# Altium PCB 2026.11.05.HMS.PD.CNHH.V5.1.PcbDoc (part 4 of 4)
Units mm, origin at the board's own origin, x right, y up, seen from the top; angles counter-clockwise.
Board outline 110 x 110 mm, 2 copper layers (Top Layer, Bottom Layer); 170 components, 117 nets, 610 pads, 1348 vias.
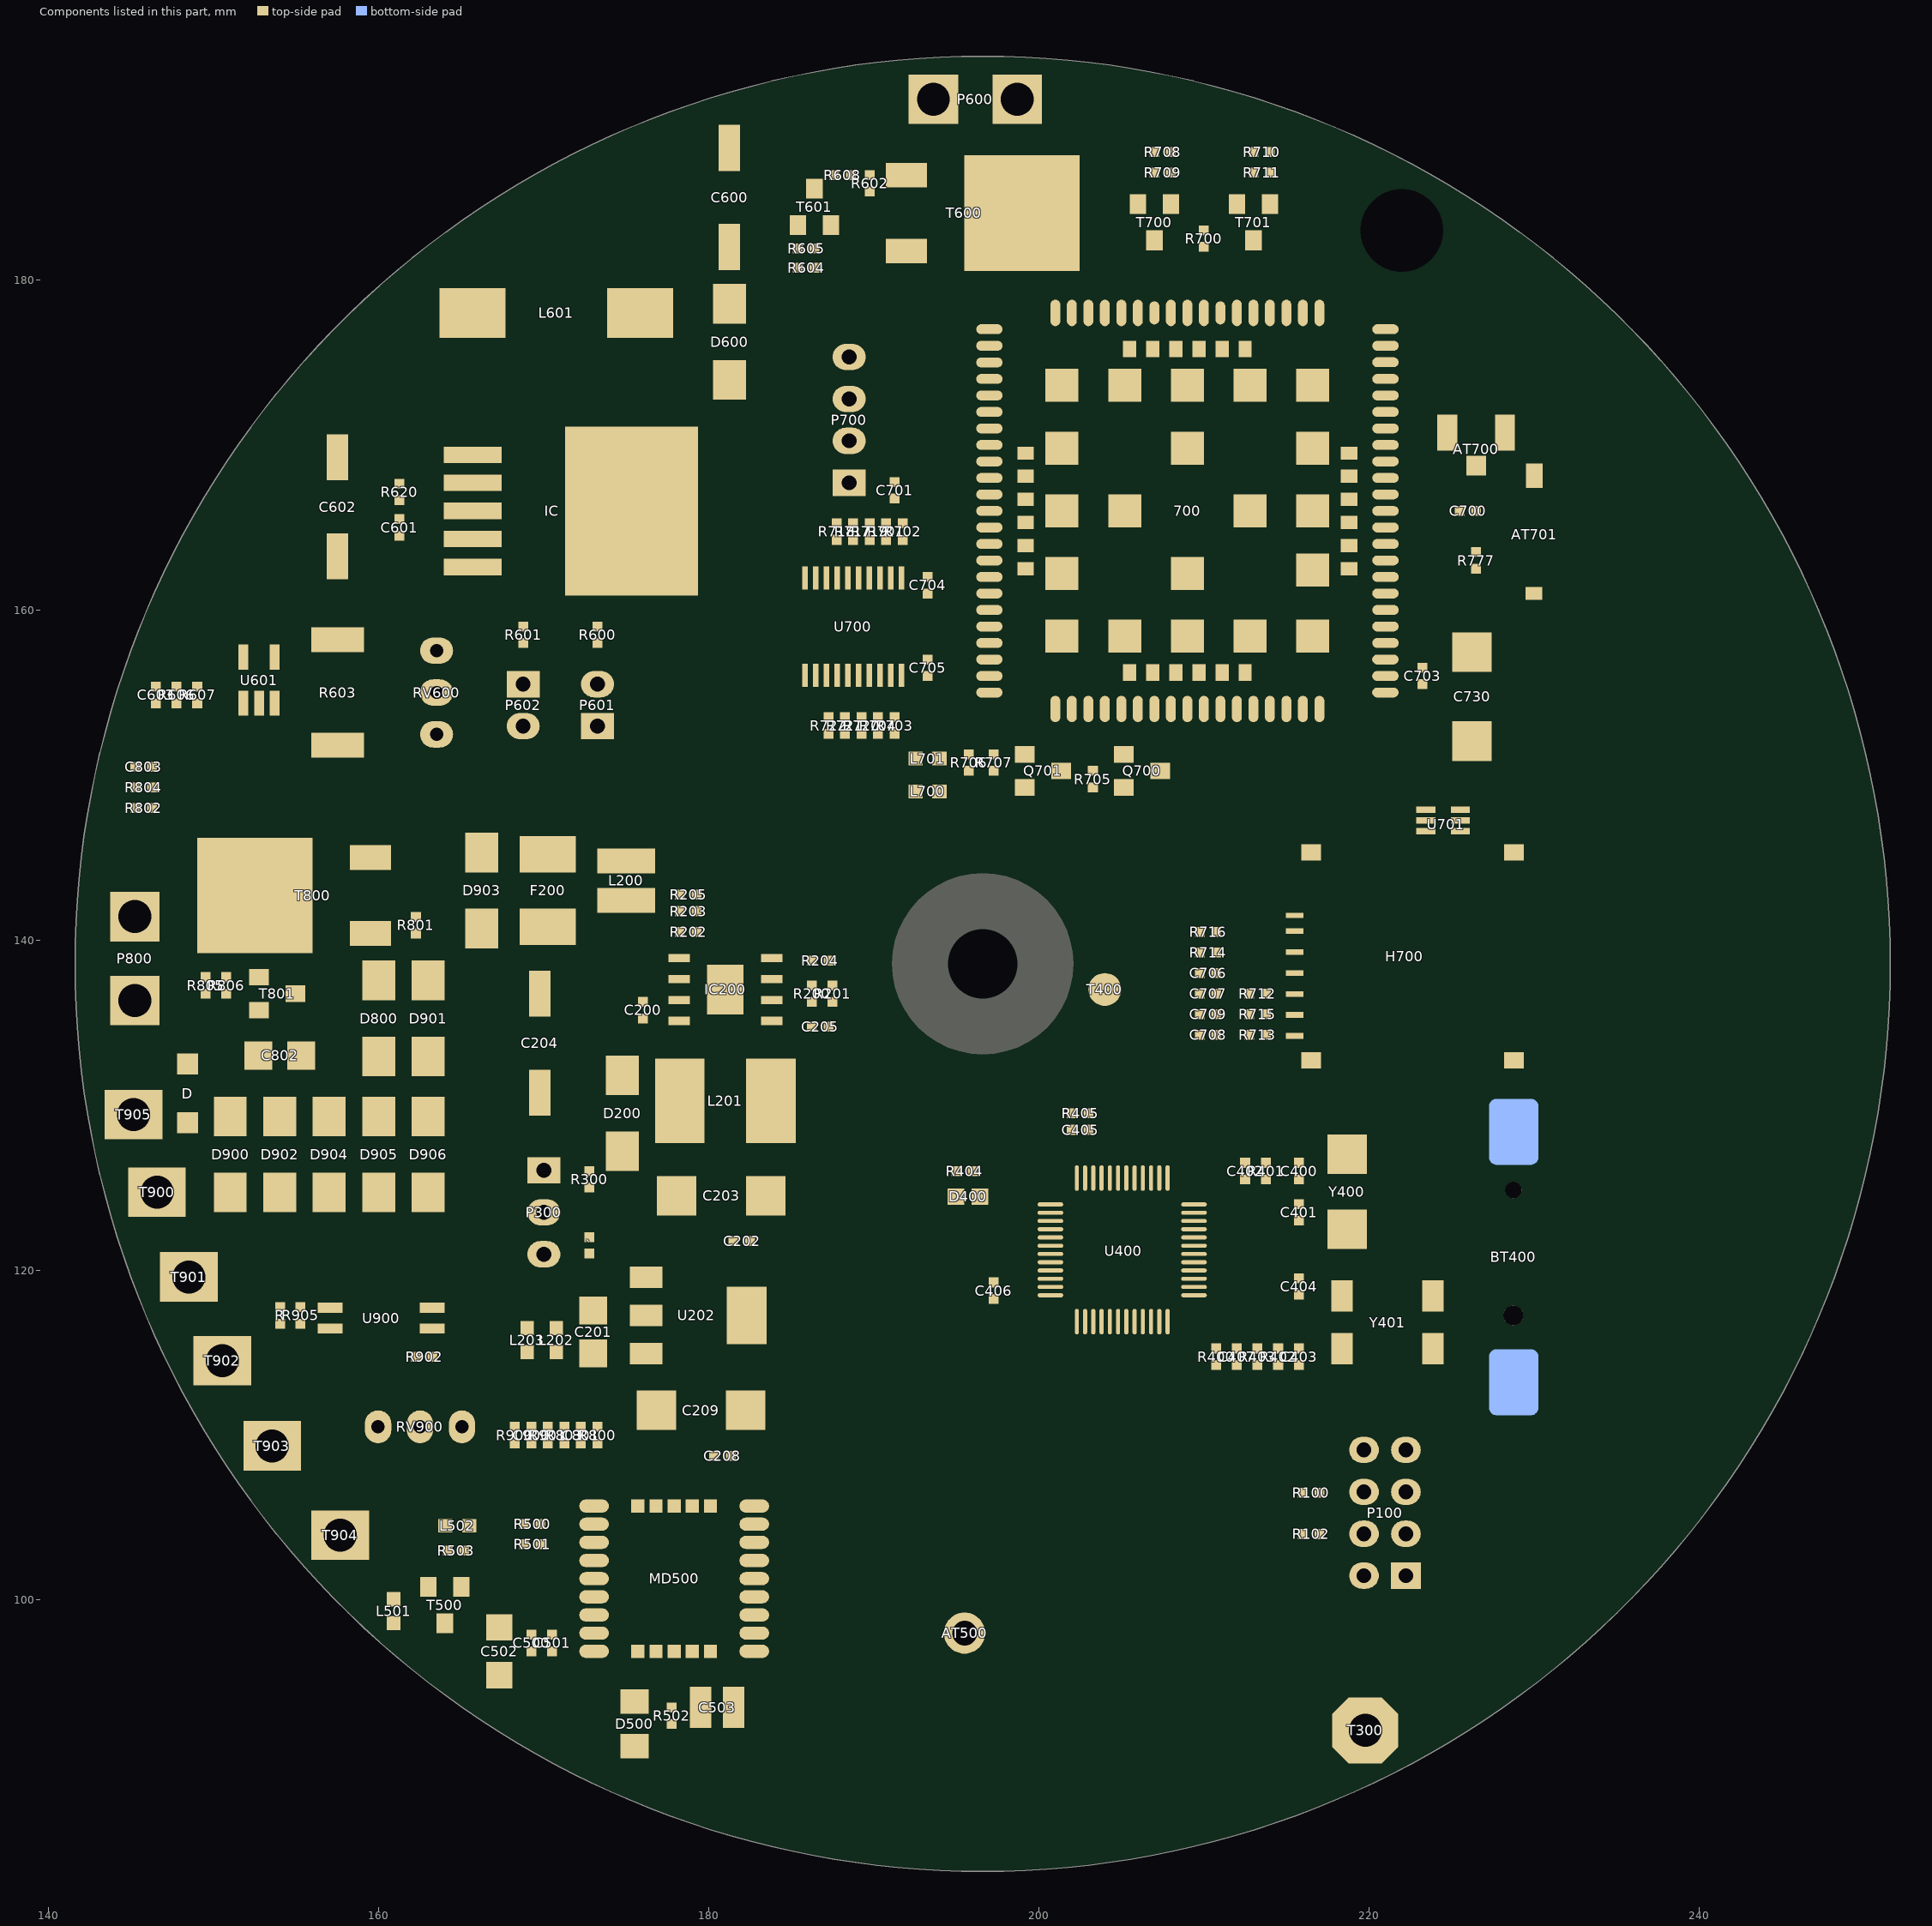
[diagram p3: the components of this part, seen from the top]

## Other copper
Top Layer:
  pour cut-out: 227.211,160.372 cw(c227.054,161.469) 225.946,161.469 225.946,161.672
  pour cut-out: 147.4,128.414 147.4,132.464 149.55,132.464 149.55,128.436
  region net GPS_PWR: 163.4,99.6 163.5,99.7 163.5,102.3 163.8,102.6 164.4,102.6 164.5,102.7 164.5,105 164.4,105.1 162.3,105.1 161.9,104.7 161.9,101.2 161.6,100.9 160.4,100.9 160.2,100.7 160.2,99.8 160.4,99.6
  region net V_SOLAR: 164,128 164.25,128.25 164.25,134 164,134.25 154.75,134.25 154.375,133.875 154.375,131.375 153.75,130.75 150,130.75 149.75,130.5 149.75,128.25 150,128
  region net V_BAT: 144,146.25 143.5,145.75 143.5,139.5 144,139 156,139 156.25,139.25 156.25,146 156,146.25
  region net V_SYSTEM: 172,139.25 166,139.25 164.25,137.5 164.25,136.5 164,136.25 162,136.25 161.75,136.5 161.75,138.75 162,139 163.25,140.25 163.25,141.25 164,142 172,142 172.25,141.75 172.25,139.5
  region net V_BAT: 167.5,148 167,148.5 149.5,148.5 147,146 148.5,144.5 155.5,144.5 157.25,146.25 163.75,146.25 164,146 164,144.25 164.25,144 167.25,144 167.5,144.25
  region net NetD800_2: 160.25,145.75 162.25,145.75 162.75,145.25 162.75,141.3 162.55,141.1 161.425,141.1 161.125,141.4 161.125,143.325 160.75,143.7 158.475,143.7 158.1,144.075 158.1,145.65 158.225,145.775
  region net GPS_VCC: 160.825,97.575 160.4,98 160.4,99.075 160.55,99.225 170.775,99.225 171.6,98.4 173.825,98.4 173.95,98.275 173.95,97.65 173.875,97.575
  region net 3.3V: 181.025,108.175 181.1,108.1 183.175,108.1 183.525,108.45 183.525,118.975 183.4,119.1 181.15,119.1 181.025,118.975
  region net VOUT: 169.225,116.025 167.775,116.025 167.7,116.1 167.7,117.9 167.875,118.075 171,118.075 171.2,117.875 171.2,116.075 171.125,116
  region net 3.3V: 191.5,155 191.6,154.9 193.2,154.9 193.6,155.3 193.6,156.3 192.3,156.3 191.8,156.8 191.5,156.8
  region net 1.8V: 193.5,162.7 193.7,162.5 193.7,161.8 193.6,161.7 192.1,161.7 192,161.6 192,161.3 191.9,161.2 191.5,161.2 191.5,162.7
  region net GSM.PWR: 204.4,149.8 204.2,149.6 202.7,149.6 202.6,149.5 202.6,147.9 203,147.5 205.65,147.5 205.8,147.65 205.8,149.7 205.7,149.8
  region net 3.3V: 196.55,118.6 196.325,118.375 196.325,116.725 196.525,116.525 198.825,116.525 199.1,116.8 200.65,118.35 201.425,118.35 201.475,118.4 201.475,118.55 201.425,118.6
  region net 3.3V: 202.425,128.75 202.25,128.925 200.05,128.925 199.7,128.575 199.7,126.5 200.55,125.65 201.75,125.65 202.175,125.225 202.175,124.8 202.225,124.75 202.375,124.75 202.425,124.8
  region net GND: 202.675,128.8 202.75,128.875 203.825,128.875 203.95,128.75 203.95,126.95 203.8,126.8 203.25,126.8 202.925,126.475 202.925,124.875 202.825,124.775 202.775,124.775 202.675,124.875
  region net 3.3V: 199.7,126.5 199.7,126.3 200,126 200.5,126
  region net 3.3V: 200.55,125.65 195.75,125.65 195.7,125.7 195.7,126.275 195.9,126.075 200.125,126.075
  region net GND: 194.6,118.85 194.4,119.05 194.4,119.85 194.6,120.05 199.25,120.05 199.6,119.7 199.6,119.325 199.825,119.1 201.5,119.1 201.525,119.075 201.3,118.85 201.175,118.85
  region net GND: 152.45,151.15 152.65,150.95 153.05,151.35 153.05,155.125 152.95,155.225 152.55,155.225 152.45,155.125
  region net GSM.GND: 185.625,163.425 185.8,163.6 186,163.4 186,160.15 185.925,160.075 185.675,160.325 185.625,160.325
  region net GSM.GND: 190.85,158.025 191.2,158.375 191.2,155.3 191.175,155.275 190.9,155.275 190.85,155.325
  region net LED_VCC: 156.575,164.8 155.825,164.05 155.825,157.375 155.9,157.3 159.35,157.3 159.625,157.575 159.625,162.3 161.125,163.8 167.425,163.8 167.5,163.875 167.5,164.75 167.45,164.8
  region net LED_VCC: 159.35,156.375 159.625,156.65 159.625,157.575 159.2,158 153.4,158 153.325,157.925 153.325,156.45 153.4,156.375
  region net LED_VCC: 155.1,157.775 156.1,158.775 156.7,158.775 156.7,157.6 156.3,157.2
  region net VIN: 153.4,150.975 153.6,150.775 159.2,150.775 159.575,151.15 159.575,155.025 159.475,155.125 153.4,155.125
  region net VIN: 150,156.3 149.7,156.6 149.7,159.7 150,160 152,160 152.2,159.8 152.2,156.5 152,156.3
  region net VIN: 168.6,144 177.7,144 178.3,144.6 178.3,147.7 178,148 168.5,148 168.3,147.8 168.3,144.3
  region net LED_VCC: 164.85,179.575 162.025,179.575 159.4,176.95 159.4,174.95 159.85,174.5 167.125,174.5 167.825,175.2 167.825,179.375 167.6,179.6
  region net NetD600_1: 169.85,166.525 170.725,167.4 170.725,171.85 173.725,174.85 173.725,179.525 173.9,179.7 177.85,179.7 178.275,179.275 178.275,175.55 178.625,175.2 182.475,175.2 182.6,175.075 182.6,161.275 182.05,160.725 171.25,160.725 170.725,161.25 170.725,164.575 169.825,165.475 163.9,165.475 163.8,165.575 163.8,166.4 163.925,166.525
  region net LED_PWR: 180.2,183.1 180.7,183.6 182.6,183.6 182.9,183.3 182.9,180.5 183.4,180 189.6,180 190.4,180.8 190.4,182.6 190.7,182.9 193.5,182.9 193.5,177.9 192.9,177.3 180.2,177.3
  region net LED_PWR: 188.9,180.7 187.9,179.7 188.5,179.1 192.3,179.1 193.5,180.3 193.5,184.3 193.1,184.7 191.075,184.7 190.075,185.7 188.9,185.7
  region net NetP600_1: 195.4,187.7 196.3,188.6 196.3,192.3 196.9,192.9 200.6,192.9 201.1,192.4 201.1,189 202.5,187.6 202.5,180.5 202.4,180.4 195.5,180.4 195.4,180.5
  region net GSM.GND: 200.496,148.5 196.138,148.5 196.138,149.4 200.496,149.4
  pour cut-out: 200.004,152.004 195.196,152.004 195.196,150.496 200.004,150.496
  pour cut-out: 206.004,152.004 202.204,152.004 202.204,149.437 206.004,149.437
  pour cut-out: 206.496,151.004 206.059,151.004 206.059,149.437 206.496,149.437
  pour cut-out: 193.5,149.729 195.362,149.729 195.362,149.437 193.5,149.437
  pour cut-out: 201.976,180.141 193.868,180.141 193.759,180.25
  pour cut-out: 157.764,139.787 157.764,134.509 161.901,134.509 161.901,139.886 157.863,139.886
  pour cut-out: 155.804,135.996 155.804,136.25 157.75,136.25 157.75,135.996
  pour cut-out: 164.254,126.154 148.562,126.154 148.562,122.96 164.254,122.96 164.254,125.713
  pour cut-out: 180.766,116.489 167.314,116.489 167.314,114.065 180.766,114.065
  pour cut-out: 171.099,118.314 167.314,118.314 167.314,116.489 171.459,116.489
  pour cut-out: 172.024,105.154 163.743,105.154 163.743,98.659 172.024,98.659
  pour cut-out: 180.404,95.004 178.304,95.004 178.304,91.996 180.404,91.996
  pour cut-out: 173.804,159.554 173.804,159.712 165.824,159.712 165.824,159.5 166.25,159.5
  pour cut-out: 164.014,159.514 164.014,165.216 170.941,165.216 170.941,159.514 165.266,159.514
  pour cut-out: 162.496,167.8 162.496,165 167.689,165 167.689,167.8
  pour cut-out: 159.884,156.65 159.884,150.25 153.146,150.25 153.146,156.65
  pour cut-out: 155.218,158.259 149.554,158.259 149.554,154.864 153.146,154.864 153.146,155.366
  region net GND: 153.141,154.864 153.141,155.225 152.354,155.225 152.354,154.864
  pour cut-out: 148.304,155.904 145.946,155.904 145.946,154.796 148.304,154.796
  pour cut-out: 151.246,153.836 147.125,153.836 147.125,154.904 149.554,154.904
  pour cut-out: 165.5,183.5 165.5,172.75 176,172.75 176,183.5
  pour cut-out: 167.689,168.454 162.496,168.454 162.496,165.059
  pour cut-out: 194.221,123.863 194.221,126.565 197.986,126.565 197.986,124.363
  pour cut-out: 202.752,128.946 204,128.946 204,129.75 202.752,129.75
  pour cut-out: 220.129,128.479 220.129,121.021 216.304,121.021 216.304,128.479
  pour cut-out: 216.304,119.629 224.779,119.629 224.779,114.021 216.304,114.021
  pour cut-out: 162.986,158.551 162.986,163.541 164.014,163.541 164.014,158.551
  pour cut-out: 154.096,135.996 154.096,145.864 160.866,145.864 160.866,135.996
  pour cut-out: 148.146,136.65 148.146,138.75 154.25,138.75 154.25,137.185 148.75,137.185 148.75,137.254
  pour cut-out: 192.407,157.059 192.407,156.5 191.25,156.5 191.25,157.059
  region net NetC200_1: 175.7,133.6 176.6,132.7 176.6,127.8 176.8,127.6 179.7,127.6 179.8,127.7 179.8,134.4 178.6,135.6 175.7,135.6
  region net VOUT: 182.2,132.8 182.4,133 185.9,133 186.1,132.8 186.1,121.4 186,121.3 182.3,121.3 182.2,121.4
  region net NetC204_1: 186.475,136.625 186.55,136.55 186.55,134.3 186.525,134.275 185.875,134.275 185.8,134.35 185.8,135.625 185.55,135.875 183.175,135.875 183.125,135.925 183.125,136.6 183.15,136.625
  region net NetC204_1: 173.2,138.95 172.75,138.5 169.25,138.5 169,138.25 169,135.2 169.2,135 173,135 174.8,136.8 174.8,139.6 176.8,141.6 176.8,143.1 176.7,143.2 173.3,143.2 173.2,143.1
  pour cut-out: 182.899,139.413 182.899,135.518 185.541,135.518 185.541,139.413
  pour cut-out: 177.696,142.304 177.696,139.946 179.804,139.946 179.804,141.054 178.804,141.054 178.804,142.304
  pour cut-out: 165.5,174.241 154,174.241 154,183.5 165.5,183.5
  region net GSM.PWR: 203,147.5 201.05,147.5 200.95,147.6 200.95,148.475 201.075,148.6 202.5,148.6 202.6,148.7
  pour cut-out: 176.7,133.6 176.7,126.9 185.4,126.9 185.4,133.6
  region net GSM.GND: 196.138,148.5 196.138,148.362 197,147.5 200.25,147.5 200.5,147.75 200.496,147.754 200.496,148.5
  region net GSM.GND: 198,150.6 198.1,150.5 198.1,149.925 198.275,149.75 200.442,149.75 200.5,149.692 200.5,147.75 200.25,147.5 197,147.5 196.138,148.362 196.138,149.388 196.35,149.6 196.35,150.475 196.475,150.6
  region net 3.3V: 199.3,126.2 199.8,126.7 200.2,126.7 200.2,125.9 200.1,125.8
  region net NetC204_1: 176.3,141.2 176.3,138.3 174.6,136.6 174,137.2 174,140.7
  region net NetC204_1: 174.3,137.1 176.2,137.1 176.3,137.2 176.3,139.1
  pour cut-out: 179.1,135.7 176.3,135.7 176.3,139.946 179.1,139.946
  pour cut-out: 172.7,146 172.7,141.05 177.15,141.05 177.15,146
  pour cut-out: 172.5,138.991 172.5,148.6 162.555,148.6 162.555,138.991
  pour cut-out: 178.804,143.304 178.804,148.6 172.5,148.6 172.5,143.304
  pour cut-out: 169.461,137.499 169.461,143.741 172.5,143.741 172.5,137.499
  pour cut-out: 162.242,118.272 162.242,115.304 166.286,115.304 166.286,118.272
  pour cut-out: 158.05,118.272 154.7,118.272 154.7,117.164 158.05,117.164
  pour cut-out: 145.696,151.054 145.696,148.554 147.333,148.554 147.333,151.054
  pour cut-out: 190.464,187.354 190.464,180.75 195.141,180.75 195.141,187.354
  pour cut-out: 186.957,180.259 188.641,180.259 188.641,180.807 186.957,180.807
  pour cut-out: 214.496,105.454 214.496,103.088 221.414,103.088 221.414,108.054 214.515,108.054
  pour cut-out: 209.446,181.446 206.5,181.446 206.5,178.809 209.612,178.809 209.612,180.74
  pour cut-out: 206.246,181.546 206.246,179.65 206.612,179.65 206.612,181.546
  pour cut-out: 207.754,181.546 209.612,181.546 209.612,181.25 207.75,181.25
  pour cut-out: 213.446,185.454 214.554,185.454 214.554,188.304 213.446,188.304
  pour cut-out: 208.754,185.454 208.754,188.304 207.446,188.304 207.446,185.454 208.514,185.454
  pour cut-out: 222.6,148.6 222.6,145.9 226.4,145.9 226.4,148.6
  region net GSM.GND: 228.025,147.45 228.025,147.05 224.975,147.05 224.975,147.45
  region net GSM.VBAT: 223.475,163.3 224.125,162.65 224.125,159.2 224.575,158.75 227.575,158.75 227.75,158.575 227.75,156.275 227.65,156.175 222.525,156.175 222.4,156.3 222.4,160.4 222.1,160.7 220.375,160.7 220.2,160.875 220.2,163.125 220.375,163.3
  pour cut-out: 224.75,172.75 224.75,169 228.25,169 228.25,172.75
  pour cut-out: 230.4,181.9 230.4,90.8 251.6,90.8 251.6,181.9
  pour cut-out: 207.9,145.4 207.9,138.514 211.304,138.514 211.304,145.4
  pour cut-out: 210.196,139.707 210.196,133.696 219.557,133.696 219.557,139.707
  pour cut-out: 216.35,149.004 216.054,149.3 215.9,149.3 211.383,144.783 211.383,144.539 211.424,144.497 211.843,144.497
  pour cut-out: 215.989,151.011 216,151 211.688,146.688 204.111,146.688 203.724,147.075 203.724,147.241 203.863,147.241 207.632,151.011
  pour cut-out: 184.8,157.004 184.8,151.8 193.4,151.8 193.4,156.559 192.407,156.559 192.407,157.004
  pour cut-out: 187.196,165.804 187.196,162.904 187.619,162.904 187.619,165.804
  pour cut-out: 225.946,167.896 225.946,161.5 227.054,161.5 227.054,167.896
  pour cut-out: 230.4,161.639 227.054,161.639 227.054,160.361 230.4,160.361
  region net 3.3V: 207.675,115.975 207.75,115.9 211.425,115.9 211.7,115.625 211.7,114.925 211.775,114.85 212.2,114.85 212.325,114.975 212.325,116.65 211.975,117 208.025,117 207.925,117.1 207.925,117.6 207.875,117.65 207.7,117.65 207.675,117.625 207.675,117.225
  pour cut-out: 216.304,114.696 213.638,114.696 213.638,116.685 216.304,116.685
  pour cut-out: 210.196,115.012 210.196,114.591 212.696,114.591 212.696,115.012
  pour cut-out: 216.304,126.054 214.304,126.054 214.304,125.226 216.304,125.226
  region net GND: 184.5,155 185.75,155 185.75,151.25 184.25,151.25 184.25,151.5
  pour cut-out: 189.873,147.89 189.873,146.638 195.75,146.638 195.75,147.89
  pour cut-out: 174.396,90.146 174.396,94.686 178.304,94.686 178.304,90.146 176.604,90.146
  pour cut-out: 151.896,137.185 151.896,136.996 154.096,136.996 154.096,137.185
  pour cut-out: 184.755,180.259 184.755,183.296 185.954,183.296 185.954,180.259
  pour cut-out: 187.154,187.204 187.154,185.496 190.464,185.496 190.464,187.204
  pour cut-out: 190.464,187.354 185.646,187.354 185.646,185.496 190.464,185.496
  pour cut-out: 220.5,177.575 218.875,177.575 218.875,172.388 220.5,172.388
  pour cut-out: 224.946,166.554 219.935,166.554 219.935,165.446 224.946,165.446
  pour cut-out: 222.525,155.916 221.844,155.916 221.844,156.69 222.525,156.69
  pour cut-out: 184.541,157.004 184.541,155 184.8,155 184.8,156.745
  pour cut-out: 174.1,133.941 175.446,133.941 175.446,136.804 174.1,136.804
  region net NetC200_1: 174.6,135.6 173.75,134.75 173.75,130.5 174,130.25 176.25,130.25 176.75,129.75 177.25,130.25 177.25,135.5 177.15,135.6
Bottom Layer:
  region net VOUT: 192.5,149.5 191.4,149.5 191.2,149.3 191.2,145.9 191.75,145.9 193.05,147.2
  region net VOUT: 193.05,147.2 193.05,149.15 192.7,149.5 192.5,149.5
  region net VOUT: 193.05,147.2 193.05,146.55 191.9,145.4 191.7,145.6 191.7,148.4
  pour cut-out: 210.391,135.399 209.188,135.399 209.188,147.589 212.112,147.589 212.112,136.017
  pour cut-out: 196.25,156.25 197.75,156.25 209.388,146.875 210.65,147.589 200.5,158 196.25,158
  pour cut-out: 201.99,147.03 201.99,151 205.541,151 205.541,147
  region net GND: 184.925,155 185.7,155 185.7,150.9 184.925,150.9
  region net GND: 185.886,151.8 185.886,155 184.5,155 184.5,151.8
  region net GND: 184.925,156.601 185.886,155.64 185.886,155 184,155 183,156

## Silkscreen, mask and mechanical layers (free items; w line width, h text height)
Top Overlay:
  text "LED-" at 183.175,189.275 h3.2
  text "LED+" at 201.675,189.275 h3.2
  text "12V" at 169.701,147.144 h2.5 r90
  text "24V" at 174.277,147.144 h2.5 r90
  text "BAT+" at 142.35,144.45 h2
  text "LED CTRL" at 207.456,132.587 h2 r90
  text "BAT-" at 142.35,131.775 h2
  text "ĐT: 0913519133" at 245.425,126.9 h3.3 r90
  text "EMAIL: matecohp@gmail.com" at 240.45,117.95 h3.3 r90
  text "TOP" at 153,113.5 h2
  text "CÔNG TY TNHH TƯ VẤN VÀ CÔNG NGHỆ HÀNG HẢI" at 238.075,97.625 h3.3 r90

## Text inside footprints (layer, text, board x,y; h text height)
C503: Top Overlay "+" at 179.992,91.35 h2 r180
P100: Top Overlay "8" at 220.208,110.624 h1.27 r90; Top Overlay "7" at 222.748,110.624 h1.27 r90; Top Overlay "1" at 222.748,99.448 h1.27 r90; Top Overlay "2" at 220.208,98.94 h1.27 r90